# Altium PCB PCB1.PcbDoc
Units mil, origin at the board's own origin, x right, y up, seen from the top; angles counter-clockwise.
Board outline 1988.19 x 3622.05 mil, 2 copper layers (Top Layer, Bottom Layer); 43 components, 26 nets, 110 pads, 26 vias.
Unrouted connection lines stored in the file: 3.
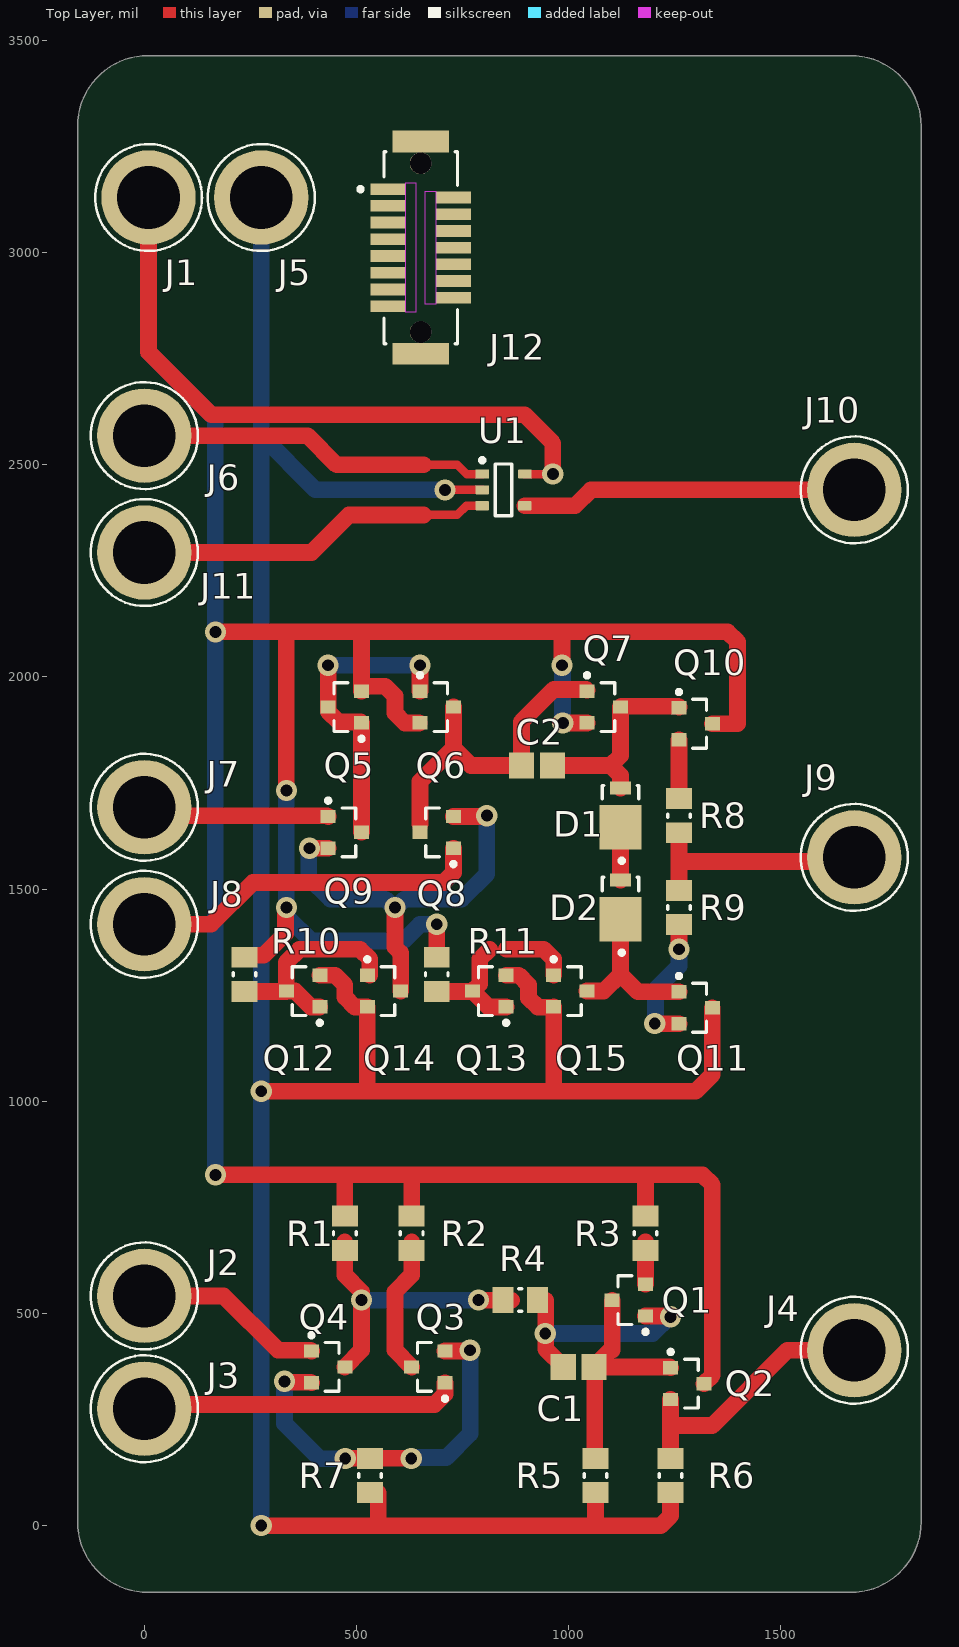
[diagram p0: Top Layer view]
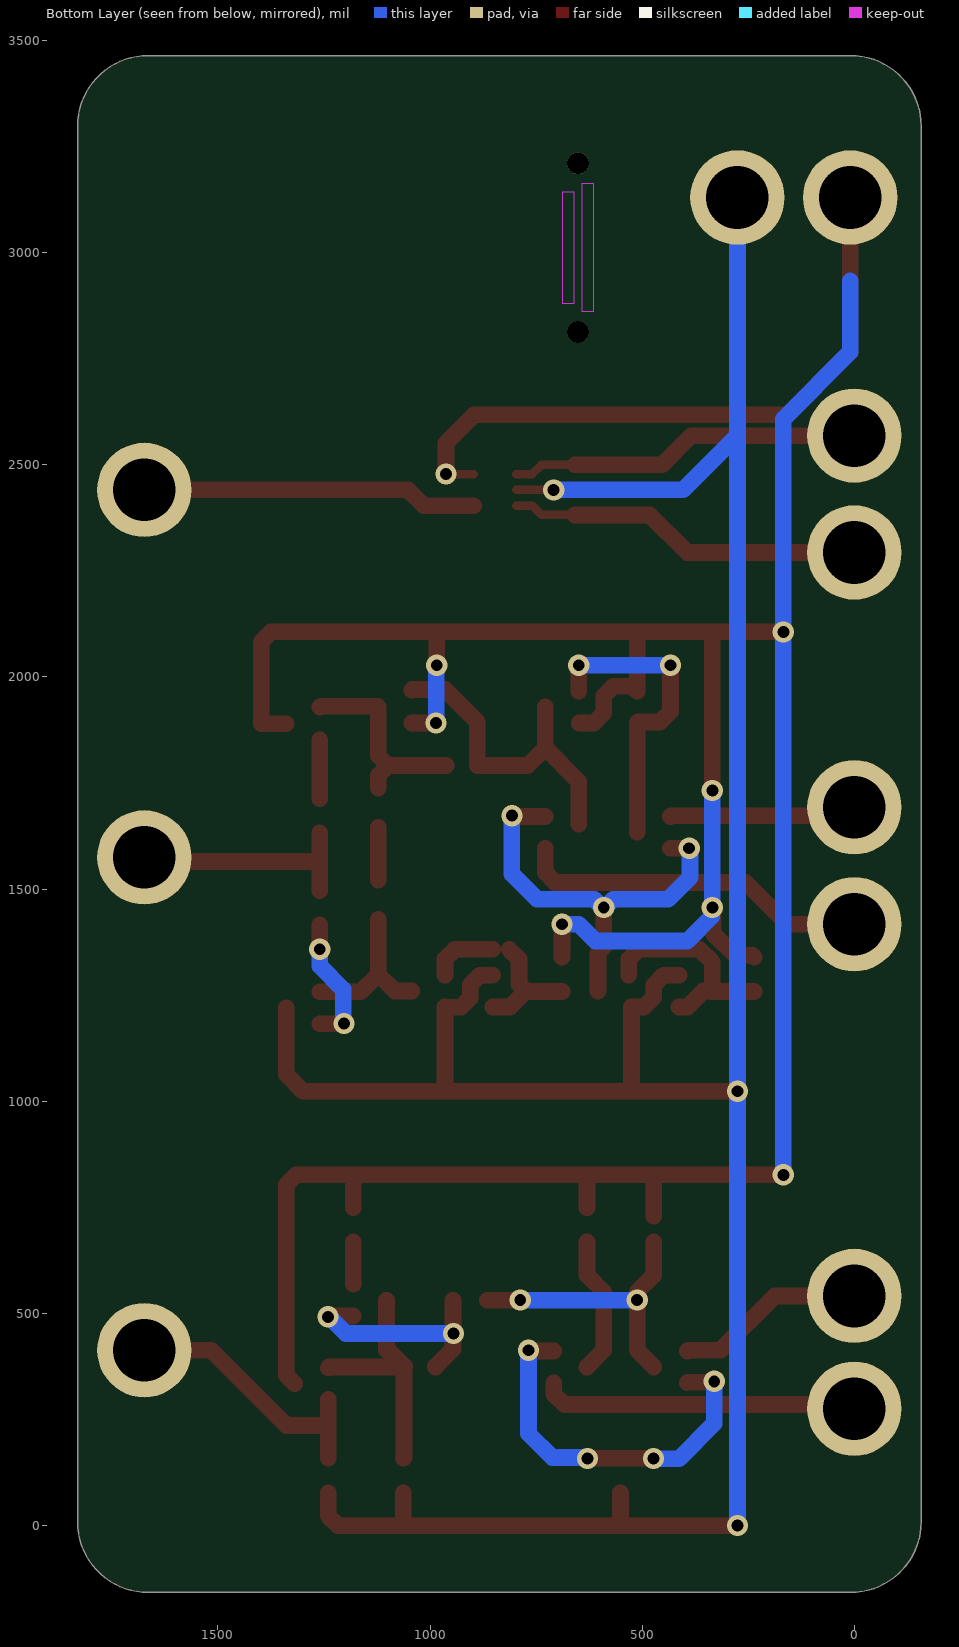
[diagram p1: Bottom Layer view, seen from below]

## Layer stack, top to bottom
Top Solder: solder mask 0.4, Solder Resist, Dk 3.5
Top Layer: signal copper 1.4
Dielectric 1: dielectric 12.6, FR-4, Dk 4.8
Bottom Layer: signal copper 1.4
Bottom Solder: solder mask 0.4, Solder Resist, Dk 3.5

## Board outline
-157.48,9.14 -157.48,314.96 -157.48,3297.24 -157.48,3297.95 cw(c9.14,3297.95) 9.14,3464.57 1664.09,3464.57 cw(c1664.09,3297.95) 1830.71,3297.95 1830.71,3297.24 1830.71,9.14 cw(c1664.09,9.14) 1664.09,-157.48 9.14,-157.48 cw(c9.14,9.14)

## Design rules (kind name [scope] priority, off if disabled: settings)
Clearance [All] p1: gap=10 ignorepadtopadclearanceinfootprint=FALSE except(0: Arc-Hole Track-Hole SMDPad-Hole THPad-Hole Via-Hole Fill-Hole Poly-Hole Region-Hole Text-Hole)
PolygonConnect [All] p1: connectstyle=Relief reliefconductorwidth=10 reliefentries=4 polygonreliefangle="90 Angle" airgapwidth=10
RoutingVias [All] p1: holewidth=28 width=50 viastyle="Through Hole" minholewidth=28 minwidth=50 maxholewidth=28 maxwidth=50
SolderMaskExpansion [All] p1: expansion=4 istentingtop=FALSE
Width [All] p1: maxlimit=78.74 minlimit=10 preferedwidth=39.37 minimp=50.000000 maximp=50.000000 favimp=50.000000
30 further rules are at their usual default settings.

## Classes and differential pairs
component class Oscillator: J12
component class ModernOpAmp: J6 J10 J11 U1
component class AdvancedDiscreteOpAmp: C2 D1 D2 J7 J8 J9 Q5 Q6 Q7 Q8 Q9 Q10 Q11 Q12 Q13 Q14 Q15 R8 R9 R10 R11
component class BasicDiscreteOpAmp: C1 J1 J2 J3 J4 J5 Q1 Q2 Q3 Q4 R1 R2 R3 R4 R5 R6 R7

## Components (designator, comment, footprint, x,y, rotation, side; value= is the part's Value field where it differs from the comment)
C1 "100p" CAPC2013X145X48ML20T23 1023.62,374.02 r180 top
C2 "100p" CAPC2013X145X48ML20T23 925.2,1791.34 r180 top
D1 "" FP-96547-MFG 1122.05,1673.23 r90 top value=10.4pF
D2 "" FP-96547-MFG 1122.05,1456.69 r90 top value=10.4pF
J1 "" FP-476-4-MFG 9.84,3129.92 r0 top
J2 "476-4" FP-476-4-MFG 0,541.34 r0 top
J3 "476-4" FP-476-4-MFG 0,275.59 r0 top
J4 "476-4" FP-476-4-MFG 1673.23,413.39 r0 top
J5 "476-4" FP-476-4-MFG 275.59,3129.92 r0 top
J6 "476-4" FP-476-4-MFG 0,2568.9 r0 top
J7 "476-4" FP-476-4-MFG 0,1692.91 r0 top
J8 "476-4" FP-476-4-MFG 0,1417.32 r0 top
J9 "476-4" FP-476-4-MFG 1673.23,1574.8 r0 top
J10 "476-4" FP-476-4-MFG 1673.23,2440.94 r0 top
J11 "476-4" FP-476-4-MFG 0,2293.31 r0 top
J12 "DF9-15P-1V(32)" FP-DF9-15P-1V_32-MFG 651.18,3011.81 r270 top
Q1 "3906" ONSC-SOT-23-3-318-08_V 1141.73,531.5 r180 top
Q2 "3904" ONSC-SOT-23-3-318-08_V 1279.53,334.65 r0 top
Q3 "3904" ONSC-SOT-23-3-318-08_V 669.29,374.02 r180 top
Q4 "3904" ONSC-SOT-23-3-318-08_V 433.07,374.02 r0 top
Q5 "3906" ONSC-SOT-23-3-318-08_V 472.44,1929.13 r180 top
Q6 "3906" ONSC-SOT-23-3-318-08_V 688.98,1929.13 r0 top
Q7 "3906" ONSC-SOT-23-3-318-08_V 1082.68,1929.13 r0 top
Q8 "3904" ONSC-SOT-23-3-318-08_V 688.98,1633.86 r180 top
Q9 "3904" ONSC-SOT-23-3-318-08_V 472.44,1633.86 r0 top
Q10 "3904" ONSC-SOT-23-3-318-08_V 1299.21,1889.76 r0 top
Q11 "3906" ONSC-SOT-23-3-318-08_V 1299.21,1220.47 r0 top
Q12 "3904" ONSC-SOT-23-3-318-08_V 374.02,1259.84 r180 top
Q13 "3904" ONSC-SOT-23-3-318-08_V 813.16,1259.84 r180 top
Q14 "3904" ONSC-SOT-23-3-318-08_V 564.79,1259.84 r0 top
Q15 "3904" ONSC-SOT-23-3-318-08_V 1003.94,1259.84 r0 top
R1 "1k" RESC2013X50X30ML20T20 472.44,688.98 r90 top
R2 "1k" RESC2013X50X30ML20T20 629.92,688.98 r90 top
R3 "200" RESC2013X50X30ML20T20 1181.1,688.98 r90 top
R4 "1k" RESC2013X50X30ML20T20 885.83,531.5 r180 top
R5 "51k" RESC2013X50X30ML20T20 1062.99,118.11 r90 top
R6 "1k" RESC2013X50X30ML20T20 1240.16,118.11 r90 top
R7 "1k" RESC2013X50X30ML20T20 531.5,118.11 r90 top
R8 "220" RESC2013X50X30ML20T20 1259.84,1673.23 r90 top
R9 "220" RESC2013X50X30ML20T20 1259.84,1456.69 r90 top
R10 "22k" RESC2013X50X30ML20T20 236.22,1299.21 r90 top
R11 "2k2" RESC2013X50X30ML20T20 688.98,1299.21 r90 top
U1 "TLV271CDBVT" DBV0005A_L 846.46,2440.94 r0 top

## Footprints (in the part's own frame and the unit in brackets; to place one, negate y for a bottom-side part, rotate by r counter-clockwise, add the part's x,y. Pads: shape width x height; smd on the part's side, far side on the other; paste and mask are expansions set on the pad)
CAPC2013X145X48ML20T23 [mm] "Chip Capacitor, 2-Leads, Body 2.00x1.25mm, IPC Low Density"
  rect 1.5x1.55 smd: 1(-0.925,0) 2(0.925,0)
  body extent -1.1,-0.72 1.1,0.72, height 1.45
DBV0005A_L [mm] "SOT23, 5-Leads, Body 3.05x1.75mm, Pitch 0.95mm, IPC High Density"
  rrect18% 0.8x0.55 smd: 1(-1.275,0.95) 2(-1.275,0) 3(-1.275,-0.95) 4(1.275,-0.95) 5(1.275,0.95)
  silkscreen extent -1.4,-1.55 0.5,1.9, body extent -1.42,-1.46 1.42,1.46, height 1.08
FP-476-4-MFG [mm]
  round 5.65 hole 3.75 paste-2539.97 mask+0: 1(0,0)
  silkscreen extent -3.2,-3.2 3.2,3.2, body extent -2.95,-2.95 2.95,2.95, height 0.25
FP-96547-MFG [mil]
  rect 105.12x100 smd paste+0 mask+0: 1(-27.5,0)
  rect 30x50 smd paste+0 mask+0: 2(65.06,0)
  silkscreen extent -111,-43 71,43, body extent -84,-54 84,54, height 10
FP-DF9-15P-1V_32-MFG [mm]
  rect 0.7x2.08 smd paste+0 mask+0: 1(-3.5,-1.96) 2(-3,1.96) 3(-2.5,-1.96) 4(-2,1.96) 5(-1.5,-1.96) 6(-1,1.96) 7(-0.5,-1.96) 8(0,1.96) 9(0.5,-1.96) 10(1,1.96) 11(1.5,-1.96) 12(2,1.96) 13(2.5,-1.96) 14(3,1.96) 15(3.5,-1.96)
  rect 1.3x3.4 smd paste+0 mask+0: 16(-6.35,0) 17(6.35,0)
  round 1.3 hole 1.3 unplated paste-2539.97 mask+0: ""(-5.05,0) ""(5.05,0)
  Keep-Out Layer region: -3.35,0.25 3.35,0.25 3.35,0.92 -3.35,0.92
  Keep-Out Layer region: -3.85,-0.92 3.85,-0.92 3.85,-0.25 -3.85,-0.25
  silkscreen extent -5.75,-3.72 5.75,2.2, body extent -7.1,-3.1 7.1,3.1, height 0.25
ONSC-SOT-23-3-318-08_V [mm] "SOT23, 3-Leads, Body 2.92x1.3mm, Pitch 0.95mm"
  rect 0.9x0.8 smd: 1(-1,0.95) 2(-1,-0.95) 3(1,0)
  silkscreen extent -1.13,-1.46 0.65,2.02, body extent -0.65,-1.46 0.65,1.46, height 1.11
RESC2013X50X30ML20T20 [mm] "Chip Resistor, 2-Leads, Body 2.00x1.25mm, IPC Low Density"
  rect 1.25x1.55 smd: 1(-1.025,0) 2(1.025,0)
  silkscreen extent -0.1,-0.67 0.1,0.67, body extent -1.1,-0.72 1.1,0.72, height 0.5

## Part data
C1 C2: library part CMP-2007-01701-1, Manufacturer=Vitramon, Part Number=VJ0805A101KXAAC
D1 D2: library part CMP-02540-000039-1, "DIODE AVALANCHE 1KV 1.5A DO220", Capacitance=10.4pF, Forward Current=1.5A, Manufacturer=Vishay, Manufacturer Part Number=AS1PM-M3/84A, Max Junction Temp=+175°C, Max Repetitive Reverse Voltage=1000V, Max Surge Forward Current=30A, Package=96547, Peak Reverse Current=0.3uA, Temperature="-55°C to +175°C", Temperature Range Low=-55°C, Automotive=Yes, Automotive Grade="Grade 0", Category=Diode, ComponentLink2Description=Datasheet, ComponentLink2URL=https://www.vishay.com/docs/89290/as1pm.pdf, Device Class L1="Discrete Semiconductors", Device Class L2=Diodes, Device Class L3="Rectifier Diodes", Digikey Description="DIODE AVALANCHE 1KV 1.5A DO220", Footprint Url=https://www.vishay.com/docs/96547/smp_do-220aa.pdf, Height=1.15mm, Lead Free=Yes, Mouser Description="AS1PM-M3/84A; SMT Avalanche Diode; 1000V 1.5A; 1.5us; 2-Pin DO-220AA", Octopart=https://octopart.com/as1pm-m3%2F84a-vishay-44629776, RoHS=TRUE, Temperature Range High=+175°C
J1: library part CMP-19636-000003-1, "PLUG JACK MINI NON-INSULATED", Current Rating=10A, Manufacturer="Keystone Electronics", Manufacturer Part Number=476-4, Automotive=No, Category=Conn, ComponentLink2Description=Datasheet, ComponentLink2URL=https://www.keyelco.com/userAssets/file/M65p111.pdf, Conn Orientation=Straight, Contact Material=Tin, Device Class L1=Connectors, Device Class L2=unset, Device Class L3=unset, Digikey Description="PLUG JACK MINI NON-INSULATED", Footprint Url=https://www.keyelco.com/product-pdf.cfm?p=2378, Is Female=yes, Lead Free=Yes, Mouser Description="Test Plugs & Test Jacks BANANA JACK NON-INSUL", Number of Contacts=1, Octopart=https://octopart.com/476-4-keystone-225161, Package=476-4, RoHS=TRUE
J2 J3 J4 J5 J6 J7 J8 J9 J10 J11: library part CMP-19636-000003-1, "PLUG JACK MINI NON-INSULATED", Current Rating=10A, Manufacturer="Keystone Electronics", Automotive=No, Category=Conn, ComponentLink2Description=Datasheet, ComponentLink2URL=https://www.keyelco.com/userAssets/file/M65p111.pdf, Conn Orientation=Straight, Contact Material=Tin, Device Class L1=Connectors, Device Class L2=unset, Device Class L3=unset, Digikey Description="PLUG JACK MINI NON-INSULATED", Footprint Url=https://www.keyelco.com/product-pdf.cfm?p=2378, Is Female=yes, Lead Free=Yes, Manufacturer Part Number=476-4, Mouser Description="Test Plugs & Test Jacks BANANA JACK NON-INSUL", Number of Contacts=1, Octopart=https://octopart.com/476-4-keystone-225161, Package=476-4, RoHS=TRUE
J12: library part CMP-11605-000052-1, "CONN HDR 15POS SMD TIN", Current Rating=500mA, Flammability Rating="UL94 V-0", Housing Color=Beige, Package Quantity=1, Voltage Rating=150V, Contact Material=Copper, Contact Plating=Tin, Gender=Male, Housing Material=Polyamide, Lead Free="Lead Free", Mated Stacking Heights=4.3mm, Mount="Surface Mount", Number of Contacts=15, Number of Positions=15, Number of Rows=2, Orientation=Straight, Packaging="Tape and Reel", Pitch=1mm, Radiation Hardening=No, Termination=SMD/SMT
Q1 Q5 Q6 Q7 Q11: library part CMP-1048-00670-1, "General Purpose Transistor, PNP Silicon, 3-Pin SOT-23, Pb-Free, Tape and Reel", Manufacturer="On Semiconductor", PartNumber=MMBT3906LT1G, ComponentLink1Description="Manufacturer URL", ComponentLink1URL=http://www.onsemi.com/, ComponentLink2Description=Datasheet, ComponentLink2URL=http://www.onsemi.cn/pub_link/Collateral/MMBT3906LT1-D.PDF, ComponentLink3Description="Package Specification", ComponentLink3URL=http://www.onsemi.cn/pub_link/Collateral/318-08.PDF, DatasheetVersion="Rev. 11", fT Min (MHz)=250, IC Continuous (A)=-0.2, Mounting Technology="Surface Mount", PackageDescription="3-Pin Small Outline Transistor, Body 2.92 x 1.3 mm, Pitch 0.95 mm", PackageReference=SOT-23-3-318-08, PackageVersion="Rev. AP, 11/2009", Packing="Tape and Reel", Polarity=PNP, RoHS=TRUE
Q2 Q3 Q4 Q8 Q9 Q10 Q12 Q13 Q14 Q15: library part CMP-1048-00630-1, "General Purpose Transistor, NPN Silicon, 3-Pin SOT-23, Pb-Free, Tape and Reel", Manufacturer="On Semiconductor", PartNumber=MMBT3904LT3G, ComponentLink1Description="Manufacturer URL", ComponentLink1URL=http://www.onsemi.com/, ComponentLink2Description=Datasheet, ComponentLink2URL=http://www.onsemi.cn/pub_link/Collateral/MMBT3904LT1-D.PDF, ComponentLink3Description="Package Specification", ComponentLink3URL=http://www.onsemi.cn/pub_link/Collateral/318-08.PDF, DatasheetVersion="Rev. 12", fT Min (MHz)=300, IC Continuous (A)=0.2, Mounting Technology="Surface Mount", PackageDescription="3-Pin Small Outline Transistor, Body 2.92 x 1.3 mm, Pitch 0.95 mm", PackageReference=SOT-23-3-318-08, PackageVersion="Rev. AP, 11/2009", Packing="Tape and Reel", Polarity=NPN, RoHS=TRUE
R1 R2 R3 R4 R5 R6 R7 R8 R9 R10 R11: library part CMP-2001-03596-1, Manufacturer="Vishay Dale", Part Number=CRCW08051K00FKEB
U1: library part CMP-0272-02196-3, "550 uA/Ch, 3 MHz, Rail-to-Rail Output Operational Amplifier, 2.7 to 16 V, 0 to 70 degC, 5-pin SOT23 (DBV5), Green (RoHS & no Sb/Br)", Manufacturer="Texas Instruments", Rating=Catalog, Total Supply Voltage(Max)(+5V is 5, +/-5V is 10)=16, Total Supply Voltage(Min)(+5V is 5, +/-5V is 10)=2.7, CMRR(Min)(dB)=69, Code_JEDEC=MO-178, ComponentLink1Description="Manufacturer URL", ComponentLink1URL=http://www.ti.com/, ComponentLink2Description=Datasheet, ComponentLink2URL=http://www.ti.com/lit/ds/symlink/tlv271.pdf, ComponentLink3Description="Package Specification", ComponentLink3URL=http://www.ti.com/litv/pdf/mpds018i, DatasheetVersion=SLOS351D, Eco-Plan="Green (RoHS & no Sb/Br)", GBW(Typ)(MHz)=3, IIB(Max)(pA)=60, Iq per channel(Max)(mA)=0.66, Mounting Technology="Surface Mount", Number of Channels=1, Offset Drift(Typ)(uV/C)=2, PackageDescription="5-Pin Plastic Small Outline, Body 1.6 x 2.9 mm, Pitch 0.95 mm", PackageReference=DBV0005A, PackageVersion="4073253-4/K, 03/2006", Packing="SMALL T&R", PartNumber=TLV271CDBVT, Slew Rate(Typ)(V/us)=2.4, Sub Family="Low Supply Voltage Amplifier (<=2.7V), Precision Amplifier", Vio (25C)(Max)(mV)=5

## Via types
v1: diameter 50, hole 28, Top Layer to Bottom Layer, 26 vias

## Nets (pads, with @x,y where several pads share a name; then routed paths per layer and width w, separated by ;. In a path a pad name is that pad's centre, name@x,y a point inside that pad or via, vN(x,y) a via of type N, cw(c..) or ccw(c..) an arc to the next point about the centre after c; other vN are vias at no path point)
INA+: J2.1 Q4.1 | length 447.5
  Top Layer w39.37: J2.1 187.01,541.34 314.96,413.39 391.73,413.39 Q4.1
INA-: J3.1 Q3.1 | length 749.3
  Top Layer w39.37: J3.1 9.84,285.43 683.63,285.43 708.66,310.46 Q3.1
INB+: J8.1 Q8.1 | length 836.3
  Top Layer w39.37: J8.1 157.48,1417.32 255.91,1515.75 705.28,1515.75 728.35,1538.81 Q8.1
INB-: J7.1 Q9.1 | length 442
  Top Layer w39.37: J7.1 19.68,1673.23 431.1,1673.23 Q9.1
INC+: J11.1 U1.3 | length 841.9
  Top Layer w20: 658.4,2381.89 737.14,2381.89 758.8,2403.54 U1.3
  Top Layer w39.37: J11.1 393.7,2293.31 482.28,2381.89 658.4,2381.89
INC-: J6.1 J10.1 U1.1 U1.4 | length 1625.8
  Top Layer w20: 658.4,2500 737.66,2500 759.31,2478.35 U1.1
  Top Layer w39.37: J6.1 0.16,2568.74 384.4,2568.74 453.14,2500 658.4,2500 ; U1.4 1014.7,2403.54 1052.1,2440.94 J10.1
NetC1_1: C1.1 Q1.3 Q2.1 R5.2 | length 575
  Top Layer w39.37: R5.2 1061.52,159.94 1061.52,372.54 C1.1 ; Q1.3 1102.36,413.39 1098.43,413.39 1060.04,375 C1.1 ; Q2.1 1238.19,374.02 C1.1
NetC1_2: C1.2 Q1.1 R4.1 | length 543.3
  Top Layer w39.37: R4.1@945.87,531.5 945.87,416.34 987.2,375 C1.2 ; Q1.1 v1@1238.19,494.09
  Bottom Layer w39.37: v1(944.88,452.76) 1197.91,452.76 1237.28,492.13 v1(1240.16,492.13)
NetC2_1: C2.1 D1.2 Q7.3 Q10.1 | length 484
  Top Layer w39.37: C2.1 1098.98,1791.34 ; D1.2 1122.05,1768.28 1098.98,1791.34 ; Q7.3 1122.05,1814.4 1098.98,1791.34 ; Q7.3@1124.02,1931.1 1257.87,1931.1 Q10.1@1259.84,1929.13
NetC2_2: C2.2 Q6.3 Q7.1 Q8.3 | length 775.8
  Top Layer w39.37: 649.61,1653.54 649.61,1753.94 728.35,1832.68 ; Q6.3 728.35,1832.68 ; Q7.1@1043.31,1968.5 1041.34,1970.47 964.57,1970.47 888.78,1894.69 C2.2 769.68,1791.34 728.35,1832.68
NetD1_1: D1.1 D2.2 | length 124
  Top Layer w39.37: D2.2 D1.1
NetD2_1: D2.1 Q11.1 Q15.3 | length 379.9
  Top Layer w39.37: Q15.3 1082.68,1259.84 1122.05,1299.21 ; D2.1 1122.05,1299.21 ; Q11.1 1163.39,1257.87 1122.05,1299.21
NetQ1_2: Q1.2 R3.1 | length 99.4
  Top Layer w39.37: Q1.2 R3.1@1181.1,668.31
NetQ3_2: Q3.2 Q4.2 R7.2 | length 916.1
  Top Layer w39.37: v1(330.28,340.12) 332.31,338.08 392.23,338.08 Q4.2 ; v1@472.44,157.48 v1(473.43,158.46) 551.18,158.46 v1(628.94,158.46) ; Q3.2 v1@765.75,411.42
  Bottom Layer w39.37: v1(330.28,340.12) 330.28,240.59 413.39,157.48 472.44,157.48 v1(473.43,158.46) ; v1(628.94,158.46) 630.97,160.5 711.68,160.5 767.72,216.54 v1(767.72,413.39)
NetQ3_3: Q3.3 R2.1 | length 326.9
  Top Layer w39.37: Q3.3 590.55,413.39 590.55,551.18 629.92,590.55 R2.1@629.92,668.31
NetQ4_3: Q4.3 R1.1 R4.2 | length 680.3
  Top Layer w39.37: Q4.3 511.81,413.39 v1(511.81,531.5) 511.81,551.18 472.44,590.55 R1.1@472.44,668.31 ; v1(787.4,531.5) R4.2@865.16,531.5
  Bottom Layer w39.37: v1(511.81,531.5) v1(787.4,531.5)
NetQ5_1: Q5.1 Q5.3 Q6.1 Q9.3 | length 731.4
  Top Layer w39.37: v1(433.07,2027.56) Q5.3 433.07,1918.73 458.1,1893.7 Q5.1@509.84,1893.7 ; Q9.3 Q5.1 ; Q6.1 v1(649.61,2027.56)
  Bottom Layer w39.37: v1(433.07,2027.56) v1(649.61,2027.56)
NetQ8_2: Q8.2 Q9.2 Q14.3 | length 1012.6
  Top Layer w39.37: v1(389.33,1596.46) Q9.2 ; v1(590.55,1456.69) 590.55,1363.64 604.16,1350.02 Q14.3 ; Q8.2 v1@805.12,1671.26
  Bottom Layer w39.37: v1(389.33,1596.46) 387.3,1594.42 387.3,1528.1 386.99,1527.8 438.42,1476.38 567.99,1476.38 587.67,1456.69 593.43,1456.69 613.11,1476.38 748.03,1476.38 807.09,1535.43 v1(807.09,1673.23)
NetQ10_2: Q10.2 R8.2 | length 138.8
  Top Layer w39.37: R8.2 Q10.2
NetQ11_2: Q11.2 R9.1 | length 314
  Top Layer w39.37: v1(1202.76,1183.07) Q11.2 ; v1(1259.84,1358.27) R9.1
  Bottom Layer w39.37: v1(1202.76,1183.07) 1204.79,1185.1 1204.79,1263.85 1259.84,1318.9 v1(1259.84,1358.27)
NetQ12_1: Q12.1 Q12.3 Q14.1 R10.1 | length 518
  Top Layer w39.37: R10.1 333.66,1258.86 Q12.3 ; Q12.1 392.72,1222.44 355.31,1259.84 Q12.3 ; Q14.1@531.5,1297.24 531.5,1335.21 508.43,1358.27 365.1,1358.27 334.65,1327.82 Q12.3
NetQ13_1: Q13.1 Q13.3 Q15.1 R11.1 | length 453.5
  Top Layer w39.37: R11.1 772.81,1258.86 Q13.3 ; 813.5,1358.27 790.44,1335.21 790.44,1276.49 Q13.3 ; Q13.1 811.19,1222.44 Q13.3 ; 852.87,1358.27 941.5,1358.27 964.57,1335.21 Q15.1
OUTA: J4.1 Q2.2 R6.2 | length 645.2
  Top Layer w39.37: R6.2 1240.16,236.22 ; Q2.2 1240.16,236.22 ; J4.1 1515.75,413.39 1338.58,236.22 1240.16,236.22
OUTB: J9.1 R8.1 R9.2 | length 553.3
  Top Layer w39.37: R9.2 1259.84,1564.96 ; R8.1 1259.84,1564.96 ; J9.1 1663.39,1564.96 1259.84,1564.96
VCC: J1.1 Q2.3 Q5.2 Q6.2 Q7.2 Q10.3 R1.2 R2.2 R3.2 R10.2 R11.2 U1.5 | length 9055.8
  Top Layer w20: U1.5 v1(962.6,2478.35)
  Top Layer w39.37: J1.1 9.84,2765.75 157.48,2618.11 895.67,2618.11 962.6,2551.18 v1(962.6,2478.35) ; v1(167.32,826.77) 472.44,826.77 ; v1(167.32,2106.3) 334.65,2106.3 ; R10.2 241.14,1344.49 281.5,1344.49 332.61,1395.6 332.61,1454.66 v1(334.65,1456.69) ; v1(334.65,1732.28) 334.65,2106.3 ; R1.2 472.44,826.77 ; R2.2@629.92,749.02 629.92,826.77 ; Q6.2@647.64,1891.73 613.61,1891.73 590.55,1914.79 590.55,1955.34 567.49,1978.4 523.68,1978.4 Q5.2 511.81,2106.3 ; R11.2 v1(688.98,1417.32) ; v1(984.25,2027.56) 984.25,2106.3 ; v1(986.22,1891.73) Q7.2 ; R3.2@1181.1,749.02 1181.1,826.77 ; Q2.3 1338.58,354.33 1338.58,803.71 1315.52,826.77 1181.1,826.77 ; Q10.3 1397.64,1889.76 1397.64,2083.24 1374.58,2106.3 984.25,2106.3 ; 334.65,2106.3 511.81,2106.3 ; 472.44,826.77 629.92,826.77 ; 511.81,2106.3 984.25,2106.3 ; 629.92,826.77 1181.1,826.77
  Bottom Layer w39.37: 9.84,2933.07 9.84,2765.75 167.32,2608.27 v1(167.32,826.77) ; v1(334.65,1732.28) v1(334.65,1456.69) 336.68,1454.66 336.68,1434.97 393.7,1377.95 610.24,1377.95 649.23,1416.94 688.6,1416.94 v1(688.98,1417.32) ; v1(984.25,2027.56) 985.24,2026.57 985.24,1892.72 v1(986.22,1891.73)
VEE: J5.1 Q11.3 Q12.2 Q13.2 Q14.2 Q15.2 R5.1 R6.1 R7.1 U1.2 | length 6847
  Top Layer w20: v1(708.66,2440.94) U1.2
  Top Layer w39.37: v1(275.59,0) 551.18,0 ; v1(275.59,1023.62) 531.5,1023.62 ; Q12.2 449.38,1297.24 472.44,1274.18 472.44,1245.5 495.5,1222.44 Q14.2 525.42,1029.7 531.5,1023.62 ; R7.1@551.18,77.76 551.18,0 ; Q13.2 882.45,1297.24 905.51,1274.18 905.51,1243.53 927.18,1221.86 963.99,1221.86 Q15.2 964.57,1023.62 ; R5.1 1062.99,0 ; R6.1 1240.16,23.06 1217.1,0 1062.99,0 ; Q11.3 1338.58,1062.99 1299.21,1023.62 964.57,1023.62 ; 531.5,1023.62 964.57,1023.62 ; 551.18,0 1062.99,0
  Bottom Layer w39.37: v1(275.59,0) v1(275.59,1023.62) 275.59,2568.9 ; J5.1@275.59,3130.84 275.59,2568.9 ; v1(708.66,2440.94) 403.54,2440.94 275.59,2568.9
pads on no net: J12. J12.1 J12.2 J12.3 J12.4 J12.5 J12.6 J12.7 J12.8 J12.9 J12.10 J12.11 J12.12 J12.13 J12.14 J12.15 J12.16 J12.17

## Silkscreen, mask and mechanical layers (free items; w line width, h text height)
Mechanical 1:
  lines w10: -157.48,3297.24 -157.48,314.96 -157.48,9.14 ccw(c9.14,9.14) 9.14,-157.48 1664.09,-157.48 ccw(c1664.09,9.14) 1830.71,9.14 1830.71,3297.24 ; -157.48,3297.95 cw(c9.14,3297.95) 9.14,3464.57 1664.09,3464.57 cw(c1664.09,3297.95) 1830.71,3297.95 ; 1653.54,452.76 1653.54,413.39 1673.23,413.39 1751.97,413.39